# Altium PCB TM_DE_Main_REV1.0.PcbDoc
Units mm, origin at the board's own origin, x right, y up, seen from the top; angles counter-clockwise.
Board outline 151.3 x 46.6 mm, 2 copper layers (Top Layer, Bottom Layer); 10 components, 386 nets, 354 pads, 0 vias.
Unrouted connection lines stored in the file: 88.
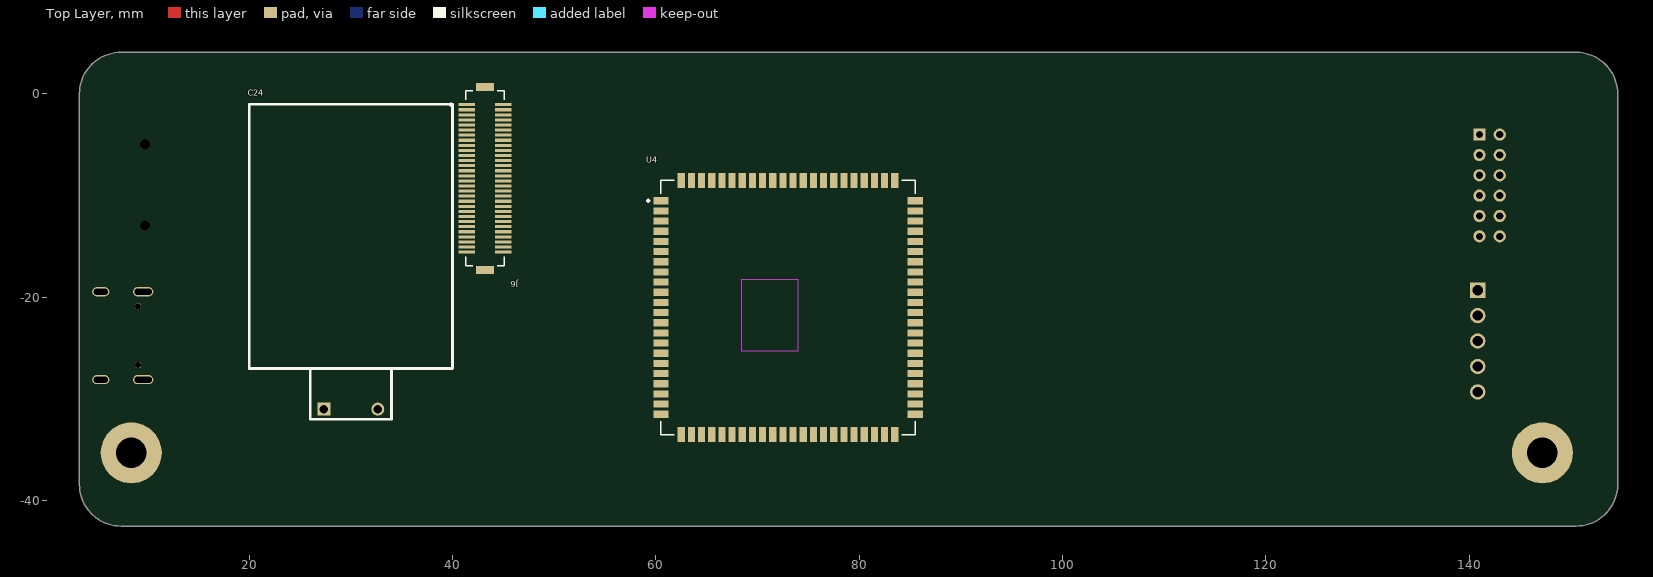
[diagram p0: Top Layer view]
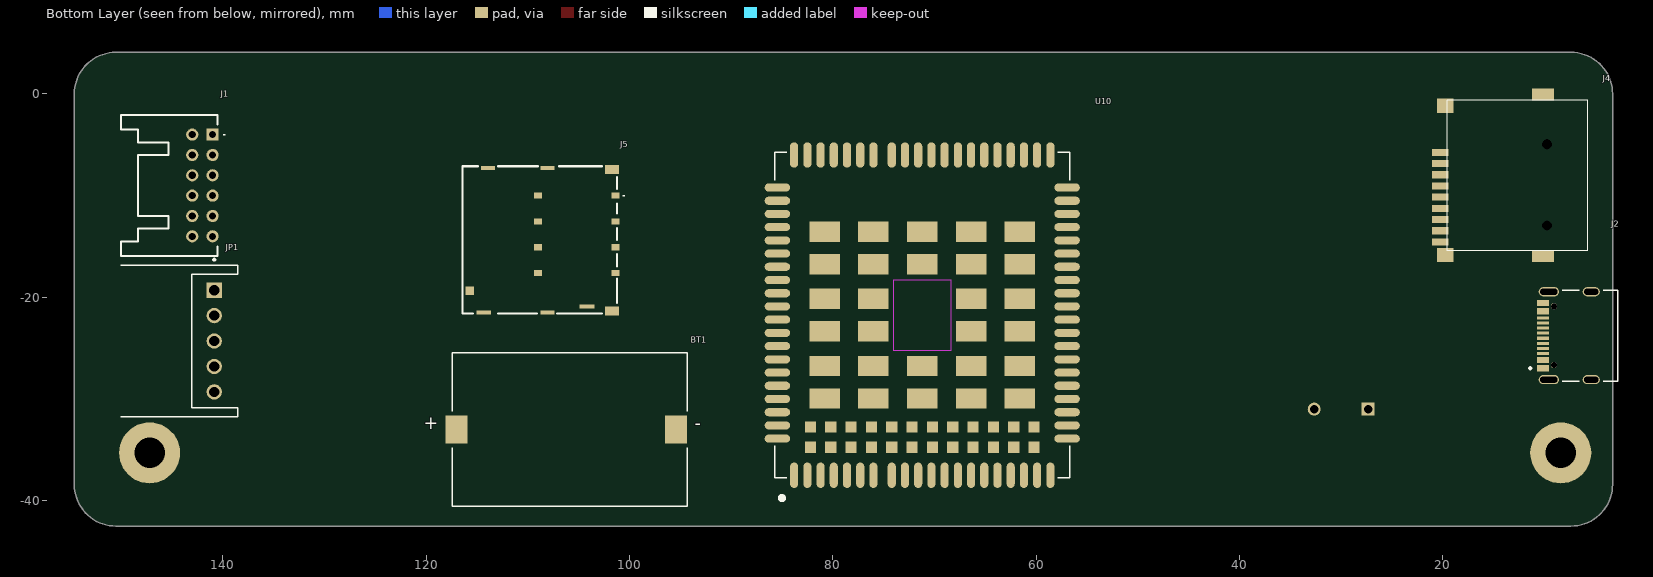
[diagram p1: Bottom Layer view, seen from below]

## Layer stack, top to bottom
Top Solder: solder mask 0.0102, Solder Resist, Dk 3.5
Top Layer: signal copper 0.0356
Dielectric 1: dielectric 0.32, FR-4, Dk 4.8
Bottom Layer: signal copper 0.0356
Bottom Solder: solder mask 0.0102, Solder Resist, Dk 3.5

## Board outline
3.3,-38.406 3.3,0 cw(c7.397,0) 7.397,4.097 150.503,4.097 cw(c150.503,0) 154.6,0 154.6,-38.406 cw(c150.503,-38.406) 150.503,-42.503 7.397,-42.503 cw(c7.397,-38.406)

## Design rules (kind name [scope] priority, off if disabled: settings)
Clearance [All] p1: gap=0.254 ignorepadtopadclearanceinfootprint=FALSE
PolygonConnect [All] p1: connectstyle=Relief reliefconductorwidth=0.254 reliefentries=4 polygonreliefangle="90 Angle" airgapwidth=0.254
RoutingVias [All] p1: holewidth=0.711 width=1.27 viastyle="Through Hole" minholewidth=0.711 minwidth=1.27 maxholewidth=0.711 maxwidth=1.27
SolderMaskExpansion [All] p1: expansion=0 istentingtop=FALSE
SupplyNets "Schematic Supply Nets_14" [InNet('+VDD_EXT')] p1: voltage=0.000
SupplyNets "Schematic Supply Nets_13" [InNet('+3V3')] p2: voltage=0.000
SupplyNets "Schematic Supply Nets_12" [InNet('+5V_MAIN')] p3: voltage=0.000
SupplyNets "Schematic Supply Nets_11" [InNet('5V_BUS')] p4: voltage=0.000
SupplyNets "Schematic Supply Nets_10" [InNet('EARTH')] p5: voltage=0.000
SupplyNets "Schematic Supply Nets_9" [InNet('+5VDC')] p6: voltage=0.000
SupplyNets "Schematic Supply Nets_8" [InNet('+VBAT')] p7: voltage=0.000
SupplyNets "Schematic Supply Nets_7" [InNet('VBUSA')] p8: voltage=0.000
SupplyNets "Schematic Supply Nets_6" [InNet('USB_5V')] p9: voltage=0.000
SupplyNets "Schematic Supply Nets_5" [InNet('+3V3DC')] p10: voltage=0.000
SupplyNets "Schematic Supply Nets_4" [InNet('+12VDC')] p11: voltage=0.000
SupplyNets "Schematic Supply Nets_3" [InNet('GND')] p12: voltage=0.000
SupplyNets "Schematic Supply Nets_2" [InNet('+12VDC_IN')] p13: voltage=0.000
SupplyNets "Schematic Supply Nets_1" [InNet('SIM_VDD')] p14: voltage=0.000
SupplyNets "Schematic Supply Nets" [InNet('BATGND')] p15: voltage=0.000
Width "Schematic Width Constraint" [InNet('NetE1_1')] p1: maxlimit=0.389 minlimit=0.389 preferedwidth=0.389 minimp=50.000000 maximp=50.000000 favimp=50.000000
Width [All] p2: maxlimit=0.254 minlimit=0.254 preferedwidth=0.254
30 further rules are at their usual default settings.

## Classes and differential pairs
component class U_10_Taxi_Toplight: gg
component class U_07_LTE_GNSS: J5 U10
component class U_06_RFID_RTC_Storage: BT1 J4
component class U_05_USB_UART_Service: J2
component class U_03_MCU_ESP32P4: U4
component class U_01_Power_Regulations: C24
component class TOP: J1 J6

## Components (designator, comment, footprint, x,y, rotation, side; value= is the part's Value field where it differs from the comment)
BT1 "BLP2016SM-G" BAT_BLP2016SM-G 105,-33 r180 bottom
C24 "DRML5R4505" DRML5R4505_horizonal 30,-31 r0 top value=5F
J1 "S12B-PHDSS__LF__SN_" S12BPHDSSLFSN 141,-4 r90 bottom
J2 "TYPE-C 16PIN 2MD(073)" HRO_TYPE-C-31-M-12 5.4,-23.775 r90 bottom
J4 "microsd" microSD_2 15,-8 r90 bottom
J5 "115I-AEAA" 115IAEAA 108.705,-14.38 r180 bottom
J6 "DF12NB(3.0)-60DP-0.5V(51)" HRS_DF12NB(3.0)-60DP-0.5V(51) 43.2,-8.303 r270 top
JP1 "S5B-XH-A" JST_S5B-XH-A 146.536,-24.3 r270 bottom
U4 "ESP32-P4_MODULE" XCVR_ESP32-P4_MODULE 73,-21 r0 top
U10 "EC25AFA-512-STD" XCVR_EC25AFA-512-STD 71.2,-21.75 r90 bottom

## Footprints (in the part's own frame and the unit in brackets; to place one, negate y for a bottom-side part, rotate by r counter-clockwise, add the part's x,y. Pads: shape width x height; smd on the part's side, far side on the other; paste and mask are expansions set on the pad)
115IAEAA [mm]
  rect 0.8x0.6 smd: C1(7.325,4.38) C2(7.325,1.84) C3(7.325,-0.7) C4(7.325,-3.24) C5(-0.295,4.38) C6(-0.295,1.84) C7(-0.295,-0.7) C8(-0.295,-3.24)
  rect 0.85x0.8 smd: D1(-7.005,-4.98)
  rect 1.5x0.4 smd: D2(4.525,-6.54)
  rect 1.4x0.87 smd: G1(6.995,6.95) G6(6.995,-6.95)
  rect 1.4x0.42 smd: G2(0.645,7.11) G3(-5.205,7.11) G4(-5.615,-7.12) G5(0.645,-7.12)
  silkscreen extent -7.73,-7.21 8.2,7.27, body extent -7.73,-7.3 7.67,7.3, height 1.62
BAT_BLP2016SM-G [mm]
  rect 2.16x2.79 smd: NEG(9.59,0) POS(-12,0)
  silkscreen extent -12.45,-7.55 10.67,7.55, body extent -13.08,-7.55 11.25,7.55, height 3.2
DRML5R4505_horizonal [mm]
  rect 1.275x1.275 hole 0.85: 1(-2.65,0)
  round 1.275 hole 0.85: 2(2.65,0)
  silkscreen extent -10,-1 10,30, body extent -10,4 10,30, height 10.2
HRO_TYPE-C-31-M-12 [mm]
  rect 0.6x1.14 smd mask+0.05: A1_B12(-3.2,4.75) A4_B9(-2.4,4.75) B1_A12(3.2,4.75) B4_A9(2.4,4.75)
  rect 0.3x1.14 smd mask+0.05: A5(-1.25,4.75) A6(-0.25,4.75) A7(0.25,4.75) A8(1.25,4.75) B5(1.75,4.75) B6(0.75,4.75) B7(-0.75,4.75) B8(-1.75,4.75)
  oval 0.9x2 hole 0.6 slot 1.7 at 90 deg: S1(-4.325,4.17) S2(4.325,4.17)
  oval 0.9x1.7 hole 0.6 slot 1.4 at 90 deg: S3(-4.325,0) S4(4.325,0)
  round 0.6 hole 0.6 unplated: ""(-2.89,3.68) ""(2.89,3.68)
  silkscreen extent -4.47,-2.6 4.47,6.1, body extent -4.47,-2.6 4.47,5.31, height 3.31
HRS_DF12NB(3.0)-60DP-0.5V(51) [mm]
  rect 0.3x1.6 smd paste-2 mask+0.05: 1(-7.25,-1.8) 2(-7.25,1.8) 3(-6.75,-1.8) 4(-6.75,1.8) 5(-6.25,-1.8) 6(-6.25,1.8) 7(-5.75,-1.8) 8(-5.75,1.8) 9(-5.25,-1.8) 10(-5.25,1.8) 11(-4.75,-1.8) 12(-4.75,1.8) 13(-4.25,-1.8) 14(-4.25,1.8) 15(-3.75,-1.8) 16(-3.75,1.8) 17(-3.25,-1.8) 18(-3.25,1.8) 19(-2.75,-1.8) 20(-2.75,1.8) 21(-2.25,-1.8) 22(-2.25,1.8) 23(-1.75,-1.8) 24(-1.75,1.8) 25(-1.25,-1.8) 26(-1.25,1.8) 27(-0.75,-1.8) 28(-0.75,1.8) 29(-0.25,-1.8) 30(-0.25,1.8) 31(0.25,-1.8) 32(0.25,1.8) 33(0.75,-1.8) 34(0.75,1.8) 35(1.25,-1.8) 36(1.25,1.8) 37(1.75,-1.8) 38(1.75,1.8) 39(2.25,-1.8) 40(2.25,1.8) 41(2.75,-1.8) 42(2.75,1.8) 43(3.25,-1.8) 44(3.25,1.8) 45(3.75,-1.8) 46(3.75,1.8) 47(4.25,-1.8) 48(4.25,1.8) 49(4.75,-1.8) 50(4.75,1.8) 51(5.25,-1.8) 52(5.25,1.8) 53(5.75,-1.8) 54(5.75,1.8) 55(6.25,-1.8) 56(6.25,1.8) 57(6.75,-1.8) 58(6.75,1.8) 59(7.25,-1.8) 60(7.25,1.8)
  rect 0.8x1.8 smd paste+0 mask+0.102: S1(-9,0) S2(9,0)
  silkscreen extent -8.6,-3.45 8.6,1.9, body extent -9.05,-2.27 9.05,2.33, height 2.3
JST_S5B-XH-A [mm]
  rect 1.508x1.508 / inner round 1.508 / far side rect 1.508x1.508 hole 1: 1(-5,5.7)
  round 1.508 hole 1: 2(-2.5,5.7) 3(0,5.7) 4(2.5,5.7) 5(5,5.7)
  silkscreen extent -8.1,-3.5 7.45,8, body extent -7.45,-3.5 7.45,8, height 6.1
microSD_2 [mm]
  round 0 hole 1: 0(-4.95,-5.25) 0(3.05,-5.25)
  rect 0.7x1.6 smd: 1(2.25,5.25) 2(1.15,5.25) 3(0.05,5.25) 4(-1.05,5.25) 5(-2.15,5.25) 6(-3.25,5.25) 7(-4.35,5.25) 8(-5.45,5.25) 9(-6.55,5.25)
  rect 1.2x2.2 smd: 10(-7.95,-4.85) 10(7.95,-4.85)
  rect 1.4x1.6 smd: 10(-7.85,4.75) 10(6.85,4.75)
  silkscreen extent -7.4,-9.25 7.4,4.55, body extent -8.05,-11.66 8.05,5.75, height 1.95
S12BPHDSSLFSN [mm]
  rect 1.2x1.2 hole 0.7: 1(0,0)
  round 1.2 hole 0.7: 2(0,2) 3(-2,0) 4(-2,2) 5(-4,0) 6(-4,2) 7(-6,0) 8(-6,2) 9(-8,0) 10(-8,2) 11(-10,0) 12(-10,2)
  silkscreen extent -11.95,-1.2 1.95,9, body extent -11.95,-0.5 1.95,9, height 5.1
XCVR_EC25AFA-512-STD [mm]
  oval 2.5x0.8 smd paste-2: 1(-15.75,12.6) 2(-15.75,11.3) 3(-15.75,10) 4(-15.75,8.7) 5(-15.75,7.4) 6(-15.75,6.1) 7(-15.75,4.8) 8(-15.75,0.4) 9(-15.75,-0.9) 10(-15.75,-2.2) 11(-15.75,-3.5) 12(-15.75,-4.8) 13(-15.75,-6.1) 14(-15.75,-7.4) 15(-15.75,-8.7) 16(-15.75,-10) 17(-15.75,-11.3) 18(-15.75,-12.6) 37(15.75,-12.6) 38(15.75,-11.3) 39(15.75,-10) 40(15.75,-8.7) 41(15.75,-7.4) 42(15.75,-6.1) 43(15.75,-4.8) 44(15.75,-3.5) 45(15.75,-2.2) 46(15.75,-0.9) 47(15.75,0.4) 48(15.75,4.8) 49(15.75,6.1) 50(15.75,7.4) 51(15.75,8.7) 52(15.75,10) 53(15.75,11.3) 54(15.75,12.6) 141(-15.75,3) 142(-15.75,1.7) 143(15.75,1.7) 144(15.75,3)
  oval 0.8x2.5 smd paste-2: 19(-9.55,-14.25) 20(-8.25,-14.25) 21(-6.95,-14.25) 22(-5.65,-14.25) 23(-4.35,-14.25) 24(-3.05,-14.25) 25(-1.75,-14.25) 26(-0.45,-14.25) 27(0.85,-14.25) 28(2.15,-14.25) 29(3.45,-14.25) 30(4.75,-14.25) 31(6.05,-14.25) 32(7.35,-14.25) 33(8.65,-14.25) 34(9.95,-14.25) 35(11.25,-14.25) 36(12.55,-14.25) 55(12.55,14.25) 56(11.25,14.25) 57(9.95,14.25) 58(8.65,14.25) 59(7.35,14.25) 60(6.05,14.25) 61(4.75,14.25) 62(3.45,14.25) 63(2.15,14.25) 64(0.85,14.25) 65(-0.45,14.25) 66(-1.75,14.25) 67(-3.05,14.25) 68(-4.35,14.25) 69(-5.65,14.25) 70(-6.95,14.25) 71(-8.25,14.25) 72(-9.55,14.25) 113(-10.85,14.25) 114(-12.15,14.25) 115(-10.85,-14.25) 116(-12.15,-14.25)
  rect 2x3 smd paste-3: 85(8.2,9.6) 86(8.2,4.8) 87(8.2,0) 88(8.2,-4.8) 89(8.2,-9.6) 90(5,9.6) 91(5,4.8) 92(5,0) 93(5,-4.8) 94(5,-9.6) 95(1.6,9.6) 96(1.6,4.8) 97(1.6,-4.8) 98(1.6,-9.6) 99(-1.6,9.6) 100(-1.6,4.8) 101(-1.6,-4.8) 102(-1.6,-9.6) 103(-5,9.6) 104(-5,4.8) 105(-5,0) 106(-5,-4.8) 107(-5,-9.6) 108(-8.2,9.6) 109(-8.2,4.8) 110(-8.2,0) 111(-8.2,-4.8) 112(-8.2,-9.6)
  rect 1.1x1.1 smd paste-2: 117(-11,11) 118(-11,9) 119(-11,7) 120(-11,5) 121(-11,3) 122(-11,1) 123(-11,-1) 124(-11,-3) 125(-11,-5) 126(-11,-7) 127(-11,-9) 128(-11,-11) 129(-13,11) 130(-13,9) 131(-13,7) 132(-13,5) 133(-13,3) 134(-13,1) 135(-13,-1) 136(-13,-3) 137(-13,-5) 138(-13,-7) 139(-13,-9) 140(-13,-11)
  Keep-Out Layer region: 3.5,-2.8 -3.5,-2.8 -3.5,2.8 3.5,2.8
  silkscreen extent -18.2,-14.5 16,14.5, body extent -16,-14.5 16,14.5, height 2.4
XCVR_ESP32-P4_MODULE [mm]
  rect 1.5x0.7 smd paste+0 mask+0.102: 1(-12.5,10.5) 2(-12.5,9.5) 3(-12.5,8.5) 4(-12.5,7.5) 5(-12.5,6.5) 6(-12.5,5.5) 7(-12.5,4.5) 8(-12.5,3.5) 9(-12.5,2.5) 10(-12.5,1.5) 11(-12.5,0.5) 12(-12.5,-0.5) 13(-12.5,-1.5) 14(-12.5,-2.5) 15(-12.5,-3.5) 16(-12.5,-4.5) 17(-12.5,-5.5) 18(-12.5,-6.5) 19(-12.5,-7.5) 20(-12.5,-8.5) 21(-12.5,-9.5) 22(-12.5,-10.5) 45(12.5,-10.5) 46(12.5,-9.5) 47(12.5,-8.5) 48(12.5,-7.5) 49(12.5,-6.5) 50(12.5,-5.5) 51(12.5,-4.5) 52(12.5,-3.5) 53(12.5,-2.5) 54(12.5,-1.5) 55(12.5,-0.5) 56(12.5,0.5) 57(12.5,1.5) 58(12.5,2.5) 59(12.5,3.5) 60(12.5,4.5) 61(12.5,5.5) 62(12.5,6.5) 63(12.5,7.5) 64(12.5,8.5) 65(12.5,9.5) 66(12.5,10.5)
  rect 0.7x1.5 smd paste+0 mask+0.102: 23(-10.5,-12.5) 24(-9.5,-12.5) 25(-8.5,-12.5) 26(-7.5,-12.5) 27(-6.5,-12.5) 28(-5.5,-12.5) 29(-4.5,-12.5) 30(-3.5,-12.5) 31(-2.5,-12.5) 32(-1.5,-12.5) 33(-0.5,-12.5) 34(0.5,-12.5) 35(1.5,-12.5) 36(2.5,-12.5) 37(3.5,-12.5) 38(4.5,-12.5) 39(5.5,-12.5) 40(6.5,-12.5) 41(7.5,-12.5) 42(8.5,-12.5) 43(9.5,-12.5) 44(10.5,-12.5) 67(10.5,12.5) 68(9.5,12.5) 69(8.5,12.5) 70(7.5,12.5) 71(6.5,12.5) 72(5.5,12.5) 73(4.5,12.5) 74(3.5,12.5) 75(2.5,12.5) 76(1.5,12.5) 77(0.5,12.5) 78(-0.5,12.5) 79(-1.5,12.5) 80(-2.5,12.5) 81(-3.5,12.5) 82(-4.5,12.5) 83(-5.5,12.5) 84(-6.5,12.5) 85(-7.5,12.5) 86(-8.5,12.5) 87(-9.5,12.5) 88(-10.5,12.5)
  silkscreen extent -13.85,-12.5 12.5,12.5, body extent -12.5,-12.5 12.5,12.5, height 3.3

## Part data
BT1: "CR2016 Holder", Package="Non-Standard MPD", Digi-Key_Part_Number=BLP2016SM-GCT-ND, MF=MPD, MP=BLP2016SM-G, SnapEDA_Link=https://www.snapeda.com/parts/BLP2016SM-G/MPD/view-part/4614401/?ref=snap
C24: "CAP.SUPER 5F 5.4V SIZE 20.5x10.0x26.0", MANUFACTURER=KORCHIP, Voltage=5.4V, Manufacturer Part Number=DRML5R4505
J1: "Connector", Manufacturer_Name="JST (JAPAN SOLDERLESS TERMINALS)", Manufacturer_Part_Number="S12B-PHDSS (LF)(SN)", Datasheet Link=https://www.jst-mfg.com/product/pdf/eng/ePHD.pdf, Height=5mm
J2: library part TYPE-C-31-M-12, "CONN RCPT Type-C 16POS SMD R/A", MANUFACTURER="SHOU HAN", Manufacturer Part Number="TYPE-C 16PIN 2MD(073)"
J4: "Connector", Part Number=L-KLS1-TF-003-H1.85-R, Ordering=https://www.ozdisan.com/konnektor-baglanti-elemanlari/sim-sd-kart-konnektorleri/sd-kart-konnektorleri/L-KLS1-TF-003-H1-85-R, PRICE=0,26439, Unit=USD
J5: "Connector", Manufacturer_Name=ATTEND, Datasheet Link=https://www.attend.com.tw/data/download/file/115I-AEAA.pdf, Height=1.52mm, Manufacturer_Part_Number=115I-AEAA
J6: "60 Position Connector Header, Outer Shroud Contacts Surface Mount Gold", Package=None, Check_prices=https://www.snapeda.com/parts/DF12NB(3.0)-60DP-0.5V(51)/Hirose/view-part/?ref=eda, MF="Hirose Electric Co Ltd", MP=DF12NB(3.0)-60DP-0.5V(51), SnapEDA_Link=https://www.snapeda.com/parts/DF12NB(3.0)-60DP-0.5V(51)/Hirose/view-part/?ref=snap
JP1: "Connector Header Through Hole, Right Angle 5 position 0.098 (2.50mm)", Package=None, Check_prices=https://www.snapeda.com/parts/S5B-XH-A/JST+Sales+America+Inc./view-part/?ref=eda, MF="JST Sales", MP=S5B-XH-A, SnapEDA_Link=https://www.snapeda.com/parts/S5B-XH-A/JST+Sales+America+Inc./view-part/?ref=snap
U4: "Dual-core RISC-V high-performance module ESP32-C6H8", MANUFACTURER="Waveshare Electronics", Manufacturer Part Number="ESP32-P4 Module"
U10: "Quectel EC25 is a series of 4G - LTE Cat 4 module optimized specially for M2M and IoT applications.", Package="Custom Quectel", Availability="In Stock", Check_prices=https://www.snapeda.com/parts/EC25AFA-512-STD/Quectel/view-part/?ref=eda, MF=Quectel, MP=EC25AFA-512-STD, PRICE=None, Purchase-URL=https://pricing.snapeda.com/search/part/EC25AFA-512-STD/?ref=eda, SnapEDA_Link=https://www.snapeda.com/parts/EC25AFA-512-STD/Quectel/view-part/?ref=snap

## Free pads (board coordinates)
  round 6 hole 3 mask+1: 6(8.4,-35.303) 6(147.2,-35.303)

## Nets (pads, with @x,y where several pads share a name; then routed paths per layer and width w, separated by ;. In a path a pad name is that pad's centre, name@x,y a point inside that pad or via, vN(x,y) a via of type N, cw(c..) or ccw(c..) an arc to the next point about the centre after c; other vN are vias at no path point)
5V_BUS: 
+3V3: J4.4
+3V3DC: U4.85 U4.86
+5V_MAIN: 
+5VDC: 
+12VDC: JP1.5
+12VDC_IN: J1.1
+VBAT: U10.57 U10.58 U10.59 U10.60
+VDD_EXT: U10.7
/km1: 
/km2: 
A1: 
A2: 
A_1: 
A_2: 
A_3: 
A_4: 
A_5: 
A_6: 
A_7: 
A_8: 
A_9: 
A_10: 
A_11: 
A_12: 
B1: 
B2: 
B_1: 
B_2: 
B_3: 
B_4: 
B_5: 
B_6: 
B_7: 
B_8: 
B_9: 
B_10: 
B_11: 
B_12: 
BATGND: J1.2
Bed1: 
BootButton: 
C1: 
C2: 
C_1: 
C_2: 
C_3: 
C_4: 
C_5: 
C_6: 
C_7: 
C_8: 
C_9: 
C_10: 
C_11: 
C_12: 
CAN_H: J1.10 J1.12
CAN_RX: U4.25
CAN_Standby: U4.26
CAN_TX: U4.24
Clock1: 
D1: 
D2: 
D_1: 
D_2: 
D_3: 
D_4: 
D_5: 
D_6: 
D_7: 
D_8: 
D_9: 
D_10: 
D_11: 
D_12: 
Distance1: 
Distance2: 
Distance3: 
Distance4: 
Distance5: 
Distance6: 
Distance7: 
Distance8: 
DP2: 
DP_1: 
DP_2: 
DP_3: 
DP_4: 
DP_5: 
DP_6: 
DP_7: 
DP_8: 
DP_9: 
DP_10: 
DP_11: 
DP_12: 
DTR: 
E1: 
E2: 
E_1: 
E_2: 
E_3: 
E_4: 
E_5: 
E_6: 
E_7: 
E_8: 
E_9: 
E_10: 
E_11: 
E_12: 
EARTH: J2.S1 J2.S2 J2.S3 J2.S4
EEM1: 
EEM2: 
ESP_EN: U4.87
EuroBOT1: 
EuroBOT2: 
EuroTOP1: 
EuroTOP2: 
Extras1: 
Extras2: 
Extras3: 
Extras4: 
Extras5: 
Extras6: 
Extras7: 
Extras8: 
F1: 
F2: 
F_1: 
F_2: 
F_3: 
F_4: 
F_5: 
F_6: 
F_7: 
F_8: 
F_9: 
F_10: 
F_11: 
F_12: 
Fare1: 
Fare2: 
Fare3: 
Fare4: 
Fare5: 
Fare6: 
Fare7: 
Fare8: 
Forhere1: 
Forhere2: 
Forhere3: 
G1.1: 
G1.2: 
G2.1: 
G2.2: 
G_1: 
G_2: 
G_3: 
G_4: 
G_5: 
G_6: 
G_7: 
G_8: 
G_9: 
G_10: 
G_11: 
G_12: 
GND: BT1.NEG C24.2 J2.A1_B12 J2.B1_A12 J4.6 J4.10 J5.C5 J5.D2 J5.G1 J5.G2 J5.G3 J5.G4 J5.G5 J5.G6 JP1.4 U4.1 U4.3 U4.15 U4.33 U4.40 U4.47 U4.52 U4.83 U10.8 U10.9 U10.10 U10.19 U10.22 U10.36 U10.46 U10.48 U10.50 U10.51 U10.52 U10.53 U10.54 U10.56 U10.72 U10.85 U10.86 U10.87 U10.88 U10.89 U10.90 U10.91 U10.92 U10.93 U10.94 U10.95 U10.96 U10.97 U10.98 U10.99 U10.100 U10.101 U10.102 U10.103 U10.104 U10.105 U10.106 U10.107 U10.108 U10.109 U10.110 U10.111 U10.112
H1: 
H2: 
Hired1: 
Hired2: 
Hired3: 
Hired4: 
IC_CLK: J5.C3
IC_IO: J5.C7
IC_RST: J5.C2
J1: 
J2: 
K1: 
K2: 
KL15_IN-Ignition: J1.3
km1: 
km2: 
L1: 
L2: 
LED_BLANK: 
LED_DATA_OUT1: 
LED_DATA_OUT2: 
LED_DATA_OUT3: 
LED_DATA_OUT4: 
LED_DATA_OUT5: 
LED_DATA_OUT6: 
LED_DATA_OUT7: 
LED_DATA_OUT9: 
LED_DATA_OUT10: 
LED_DATA_OUT11: 
LED_DR_CLK: 
LED_DR_DT: U4.88
LED_DR_LATCH: 
M1: 
M2: 
MD_RX: U4.74
MD_TX: U4.73
N1: 
N2: 
NetBT1_POS: BT1.POS
NetC1_1: 
NetC1_2: 
NetC12_1: 
NetC12_2: 
NetC15_2: 
NetC20_1: 
NetC21_1: 
NetC24_1: C24.1
NetC26_2: 
NetC32_2: 
NetC34_1: 
NetC41_2: 
NetC43_2: U4.58
NetC45_2: 
NetC49_2: 
NetC57_2: 
NetC58_2: 
NetC68_2: U10.20
NetC70_2: 
NetC71_1: 
NetC71_2: U10.47
NetC74_2: 
NetC91_2: 
NetD2_3: 
NetD3_1: 
NetD3_3: 
NetD4_1: 
NetD4_3: 
NetD6_1: 
NetD7_1: 
NetD8_5: 
NetD10_2: 
NetD20_1: 
NetD20_2: 
NetE1_1: U10.49
NetJ2_A5: J2.A5
NetJ2_B5: J2.B5
NetJ4_1: J4.1 U4.69
NetJ4_2: J4.2 U4.70
NetJ4_3: J4.3 U4.72
NetJ4_5: J4.5 U4.71
NetJ4_7: J4.7 U4.67
NetJ4_8: J4.8 U4.68
NetL2_1: 
NetL3_1: 
NetL3_2: 
NetL6_2: 
NetLED169_2: 
NetLED184_2: 
NetQ3_1: 
NetQ3_3: 
NetQ4_1: 
NetQ5_1: 
NetQ6_1: 
NetQ6_3: U4.62
NetQ7_1: 
NetQ7_3: 
NetQ8_1: 
NetQ8_3: 
NetQ9_1: 
NetQ9_3: 
NetQ10_1: 
NetQ10_3: 
NetQ11_1: 
NetQ11_3: U10.21
NetQ12_1: 
NetQ13_1: 
NetQ14_1: 
NetQ14_3: 
NetQ16_1: 
NetR8_2: 
NetR14_1: U4.57
NetR17_2: 
NetR20_1: 
NetR21_1: 
NetR22_1: 
NetR23_1: 
NetR26_2: U4.54
NetR35_1: 
NetR44_2: U4.29
NetR45_2: U4.31
NetR50_2: U4.30
NetR56_1: 
NetR56_2: U4.23
NetR57_1: 
NetR57_2: U4.22
NetR58_1: U4.75
NetR60_1: 
NetR63_1: U4.76
NetR68_1: U4.77
NetR71_1: U4.78
NetR77_1: 
NetR78_1: 
NetR79_1: 
NetR80_1: 
NetR81_1: 
NetR82_1: 
NetR83_1: 
NetR84_1: 
NetR85_1: 
NetR86_1: 
NetR87_1: 
NetR88_1: 
NetR89_1: U4.16
NetR90_2: 
NetR91_1: 
NetU4_21: U4.21
NetU4_27: U4.27
NetU4_28: U4.28
NetU4_32: U4.32
NetU4_50: U4.50
NetU4_51: U4.51
NetU4_53: U4.53
NetU4_55: U4.55
NetU4_56: U4.56
NetU4_59: U4.59
NetU4_60: U4.60
NetU4_63: U4.63
NetU4_79: U4.79
NetU4_80: U4.80
NetU4_81: U4.81
NetU4_82: U4.82
NetU18_22: 
NFC1: 
NH1: 
NH2: 
OSCIN: 
OSCOUT: 
Rate1: 
Rate2: 
Rate3: 
Rate4: 
RF_ANT1: 
RF_ANT2: 
RGB_Blue: 
RGB_Green: 
RGB_Red: 
RTS: 
RX: 
RX_MODULE: U10.68
Service1: 
SIM_VDD: J5.C1 U10.14
SPEEDPWM: U4.17
SpeedSensor: J1.5
SSP0_DETECT: J4.9 U4.61
STATUS: U10.61
Stopped1: 
Stopped2: 
Stopped3: 
Stopped4: 
Taxi1: 
Taxi2: 
TAXI_ROOF_LAMP_OUT_0: JP1.1
TAXI_ROOF_LAMP_OUT_1: JP1.2
TAXI_ROOF_LAMP_OUT_2: JP1.3
Touch1: 
Touch2: 
Touch3: 
Touch4: 
Touch5: 
Touch6: 
TX1: 
TX2: 
TX_MODULE: U10.67
USB2UART_RX: U4.64
USB2UART_TX: U4.65
USB_5V: 
USB_DBG_D_N: J2.A7 J2.B7
USB_DBG_D_P: J2.A6 J2.B6
USBD_N: U4.48
USBD_P: U4.49
USIM_CLK: U10.16
USIM_DATA: U10.15
USIM_PRESENCE: J5.D1 U10.13
USIM_RST: U10.17
VBUSA: J2.A4_B9 J2.B4_A9
Vfeed: 
VMID: 
pads on no net: J1.4 J1.6 J1.7 J1.8 J1.9 J1.11 J2. J2.A8 J2.B8 J4.0 J5.C4 J5.C6 J5.C8 J6.1 J6.2 J6.3 J6.4 J6.5 J6.6 J6.7 J6.8 J6.9 J6.10 J6.11 J6.12 J6.13 J6.14 J6.15 J6.16 J6.17 J6.18 J6.19 J6.20 J6.21 J6.22 J6.23 J6.24 J6.25 J6.26 J6.27 J6.28 J6.29 J6.30 J6.31 J6.32 J6.33 J6.34 J6.35 J6.36 J6.37 J6.38 J6.39 J6.40 J6.41 J6.42 J6.43 J6.44 J6.45 J6.46 J6.47 J6.48 J6.49 J6.50 J6.51 J6.52 J6.53 J6.54 J6.55 J6.56 J6.57 J6.58 J6.59 J6.60 J6.S1 J6.S2 U4.2 U4.4 U4.5 U4.6 U4.7 U4.8 U4.9 U4.10 U4.11 U4.12 U4.13 U4.14 U4.18 U4.19 U4.20 U4.34 U4.35 U4.36 U4.37 U4.38 U4.39 U4.41 U4.42 U4.43 U4.44 U4.45 U4.46 U4.66 U4.84 U10.1 U10.2 U10.3 U10.4 U10.5 U10.6 U10.11 U10.12 U10.18 U10.23 U10.24 U10.25 U10.26 U10.27 U10.28 U10.29 U10.30 U10.31 U10.32 U10.33 U10.34 U10.35 U10.37 U10.38 U10.39 U10.40 U10.41 U10.42 U10.43 U10.44 U10.45 U10.55 U10.62 U10.63 U10.64 U10.65 U10.66 U10.69 U10.70 U10.71 U10.113 U10.114 U10.115 U10.116 U10.117 U10.118 U10.119 U10.120 U10.121 U10.122 U10.123 U10.124 U10.125 U10.126 U10.127 U10.128 U10.129 U10.130 U10.131 U10.132 U10.133 U10.134 U10.135 U10.136 U10.137 U10.138 U10.139 U10.140 U10.141 U10.142 U10.143 U10.144

## Silkscreen, mask and mechanical layers (free items; w line width, h text height)
Mechanical 1:
  the board outline again, w0.254

## Text inside footprints (layer, text, board x,y; h text height)
BT1: Mechanical 13 "-" at 93.57,-33 h1.27; Mechanical 13 "+" at 120.24,-33 h1.27; Bottom Overlay "-" at 93.57,-33 h1.27; Bottom Overlay "+" at 120.24,-33 h1.27
J2: Mechanical 13 "PCB EDGE" at 3.5,-18.575 h0.61 r270
JP1: Mechanical 13 "PCB Edge" at 149.739,-32.217 h0.81 r90